# Altium PCB Control_Board.PcbDoc (part 3 of 4)
Units mm, origin at the board's own origin, x right, y up, seen from the top; angles counter-clockwise.
Board outline 90.17 x 96 mm, 6 copper layers (Top Layer, GND, POWER, Signal, PGND, Bottom Layer), stack 1.346 mm thick; 251 components, 196 nets, 963 pads, 633 vias.
Unrouted connection lines stored in the file: 3.
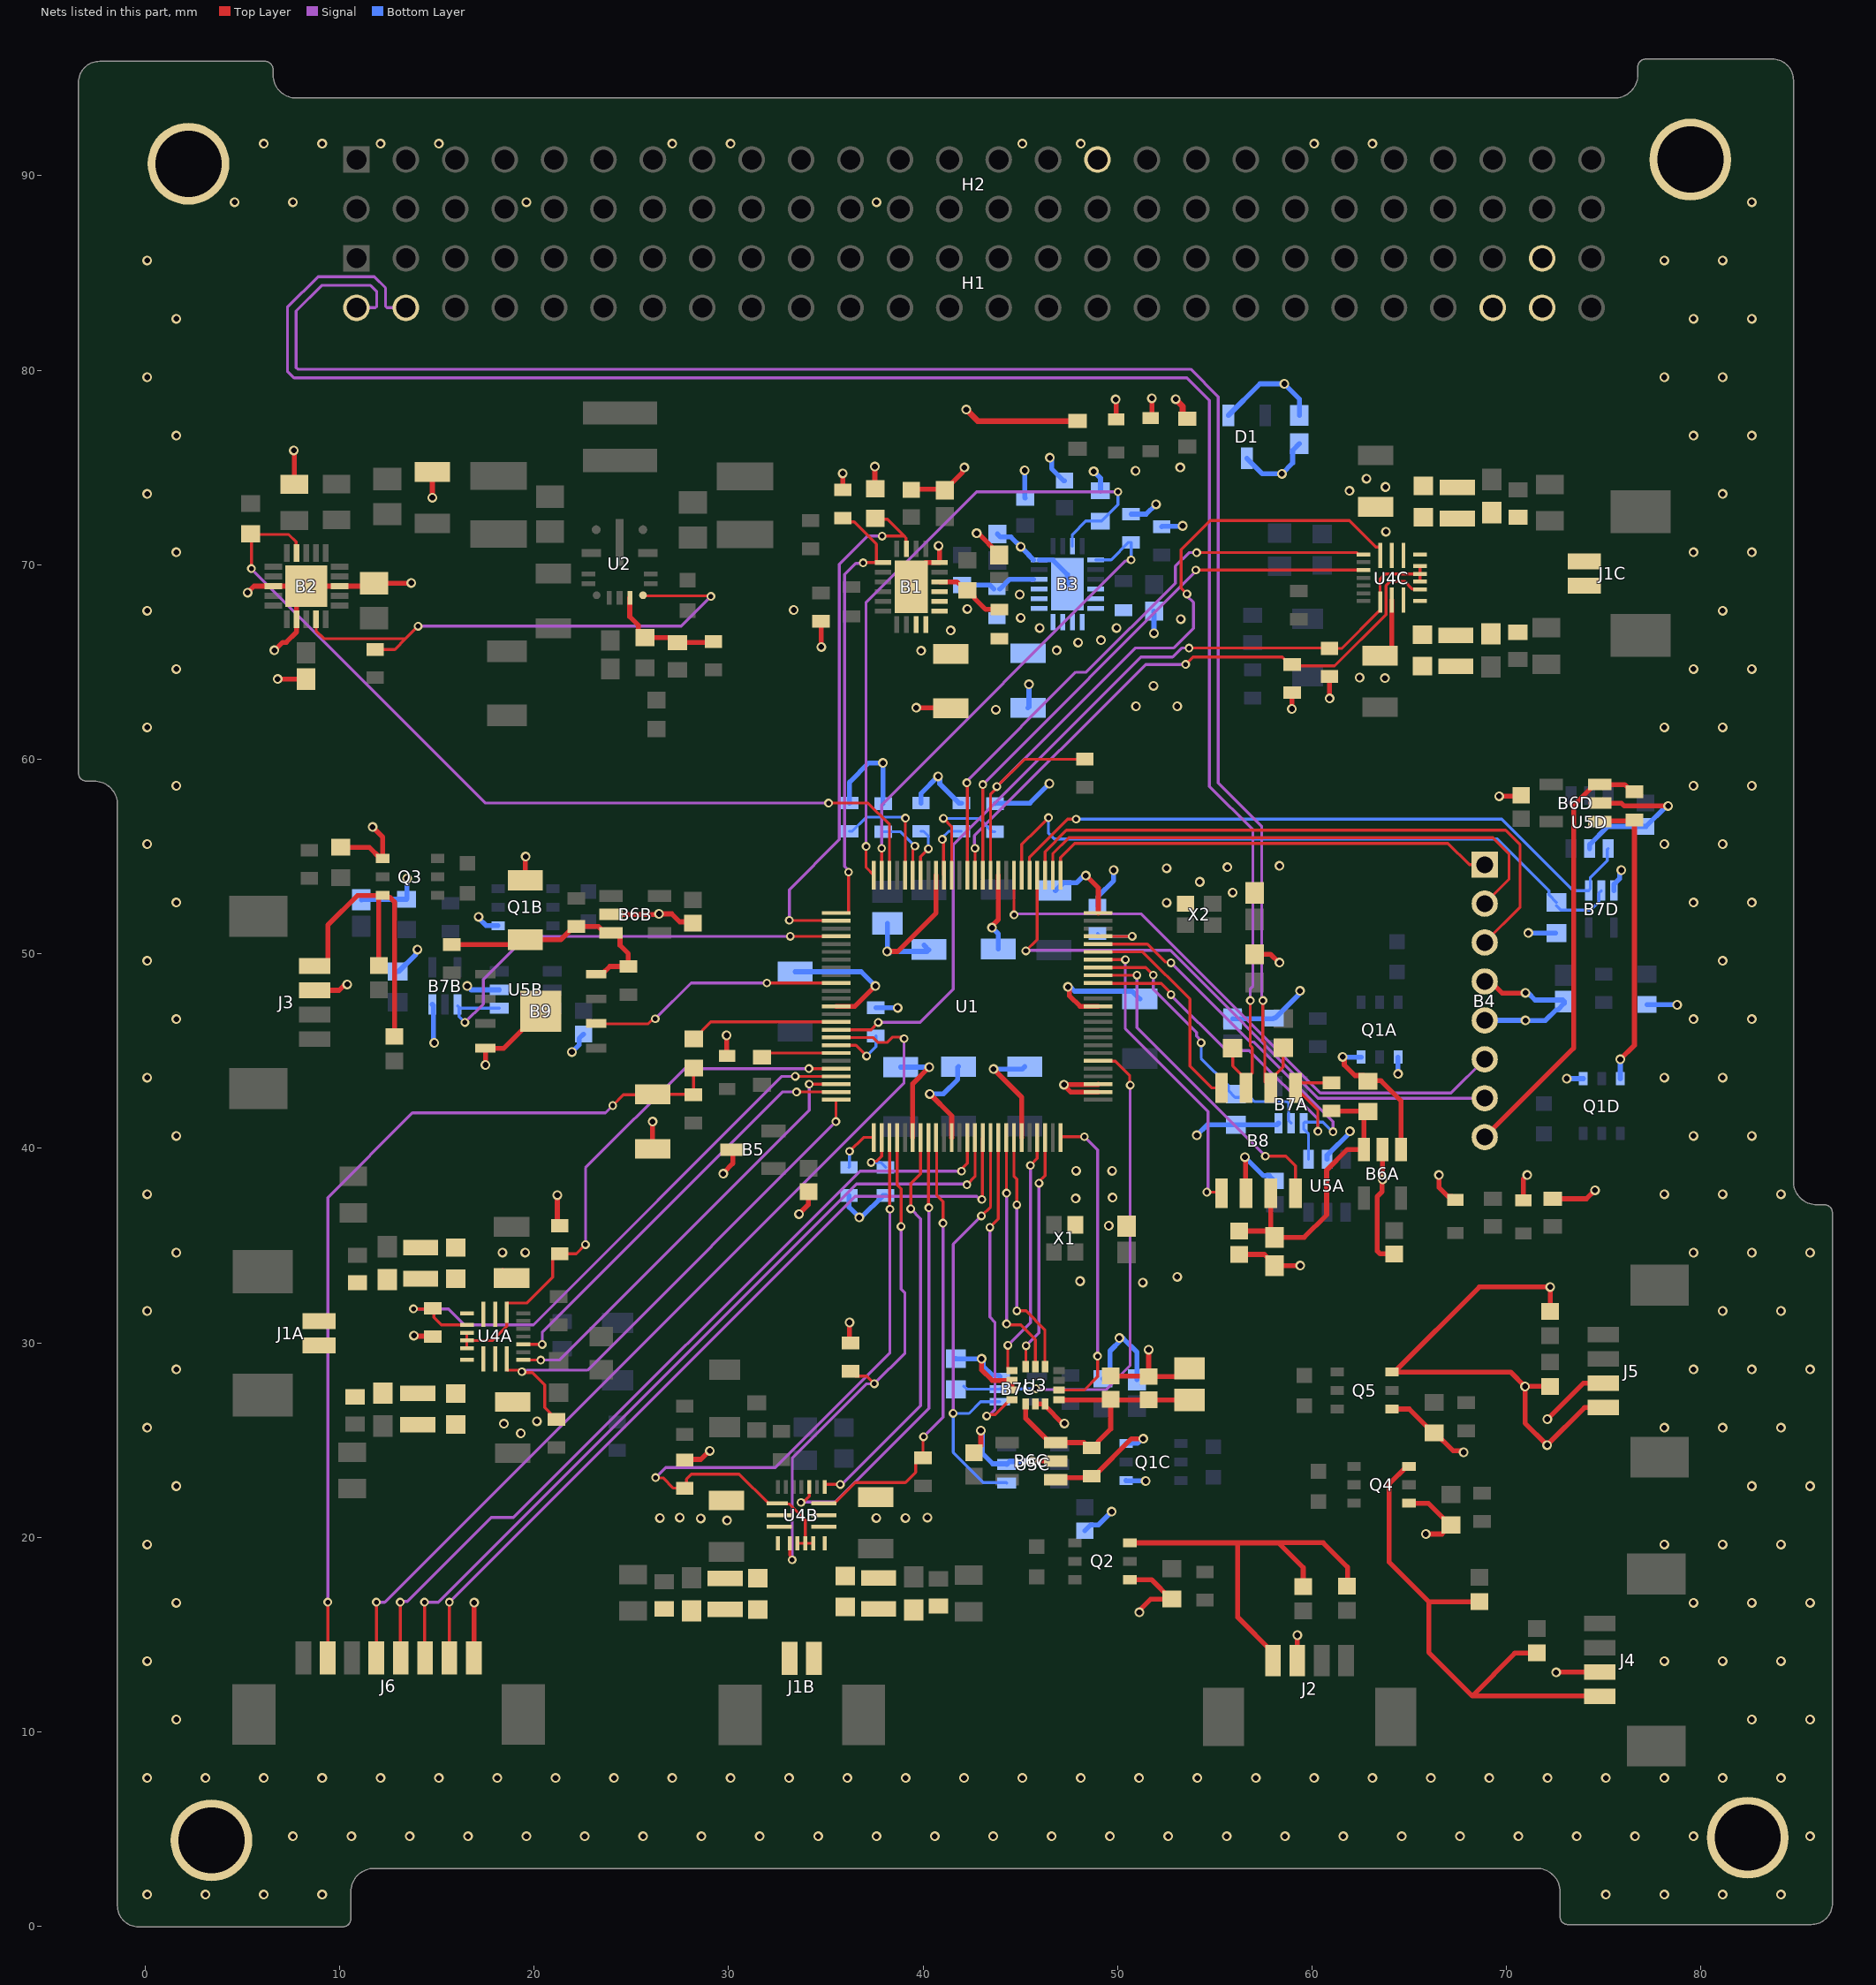
[diagram p6: the nets of this part, all layers, seen from the top]

## Via types
v1: diameter 0.5, hole 0.3, Top Layer to Bottom Layer, 487 vias
v2: diameter 0.45, hole 0.25, Top Layer to Bottom Layer, tented both sides, 146 vias

## Nets (pads, with @x,y where several pads share a name; then routed paths per layer and width w, separated by ;. In a path a pad name is that pad's centre, name@x,y a point inside that pad or via, vN(x,y) a via of type N, cw(c..) or ccw(c..) an arc to the next point about the centre after c; other vN are vias at no path point) (continued)
GND: (continued)
  Bottom Layer w0.254: C46B.1@11.125,52.778 11.152,52.805 R60B.1@13.45,52.805 13.475,52.83 v1(13.475,53.875) ; R58B.1@13,49.09 13.04,49.09 13.921,49.971 13.921,50.135 v1(14.007,50.22) ; B7B.3@14.775,47.4 14.825,47.35 14.825,45.475 v1(14.875,45.425) ; v1(16.571,48.35) 16.771,48.15 U5B.2@18.213,48.15 ; v1(17.15,51.9) 17.15,51.836 17.536,51.45 Q1B.1@18.156,51.45 ; v1(21.95,44.95) 22.318,45.318 22.318,45.643 C45B.2@22.55,45.875 ; C7.1@33.43,49.078 36.822,49.078 v1(37.55,48.35) ; R5.1@36.2,37.575 36.2,36.975 v1(36.725,36.45) 36.825,36.45 37.95,37.575 R6.1@38.075,37.575 ; R15.1@36.225,57.75 36.225,58.819 37.216,59.81 v1(37.94,59.81) 37.94,57.735 R14.1@37.95,57.725 ; R4.1@37.575,47.225 v1(38.7,47.225) ; v1(38.15,50.125) C8.1@40.203,50.125 ; C9.1@38.175,51.565 38.175,50.15 v1@38.285,50.04 ; C6.1@38.85,44.178 38.853,44.175 v1(40.325,44.175) ; R13.1@39.9,57.75 39.9,58.25 v1(40.775,59.125) 40.86,59.04 40.86,58.74 41.85,57.75 R12.1@41.975,57.75 ; C8.1@40.055,50.445 C8.1@40.3,50.2 ; v1(40.35,42.8) 41.05,42.8 41.788,43.538 41.788,44.165 C5.1@41.825,44.203 ; R58C.1@41.7,29.19 41.71,29.18 v1(43.01,29.18) 43.095,29.095 43.095,28.805 43.552,28.348 43.877,28.348 B7C.3@43.95,28.275 ; v1(42.975,25.5) 43.06,25.415 43.06,24.31 43.582,23.788 44.262,23.788 U5C.2@44.3,23.75 44.452,23.902 44.975,23.902 44.998,23.925 v1(45.625,23.925) ; v1(43.55,51.347) 43.55,51.344 43.875,51.019 C10.1@43.875,50.244 ; v1(43.625,44.075) 45.1,44.075 C4.1@45.225,44.2 ; R11.1@43.7,57.725 43.712,57.737 45.263,57.737 45.275,57.75 45.5,57.75 v1(46.5,58.75) ; R43.1@43.825,71.58 43.975,71.43 44.522,71.43 v1(45.027,70.925) 45.449,70.503 45.449,70.48 B3.16@45.677,70.252 ; v1(45.225,74.85) 45.225,73.449 R44.2@45.25,73.424 ; C27.2@45.4,62.65 45.45,62.7 v1(45.45,63.85) ; B3.16@45.975,70.25 45.977,70.248 46.677,70.248 47.425,69.5 B3.21@47.425,69 ; v1(46.525,75.5) 46.61,75.415 46.61,74.94 47.225,74.325 C29.2@47.275,74.325 ; C2.1@46.812,53.253 47.213,53.654 47.902,53.654 48.274,54.025 v1(48.375,54.025) ; v1(47.45,48.3) 47.571,48.3 47.792,48.079 50.749,48.079 C3.1@51.15,47.678 ; C45C.2@48.325,20.35 48.623,20.648 49.023,20.648 v1(49.7,21.325) ; v1(48.775,74.8) 49.125,74.45 R45.1@49.125,73.805 ; R9.1@48.975,52.5 49.002,52.527 49.002,52.962 49.8,53.76 v1(49.8,54.3) ; R60C.1@49.25,28.155 49.305,28.155 49.613,28.463 49.613,29.588 50.187,30.162 v1(50.1,30.25) ; v1@50.313,30.212 51,29.525 C46C.1@51,28.103 ; Q1C.1@50.44,22.925 50.453,22.912 51.438,22.912 v1(51.45,22.9) ; R42.1@50.7,72.6 51.473,72.6 v1(51.982,73.109) ; v1(51.875,66.475) R41.1@51.875,67.62 ; R46.1@52.275,71.95 52.3,71.975 53.325,71.975 v1(53.35,72) ; v1(54.075,40.675) 54.608,41.208 R58A.1@56.077,41.208 58.202,41.208 58.275,41.281 B7A.3@58.275,41.3 ; D1.1@55.7,77.675 57.325,79.3 v1(58.575,79.3) 59.35,78.525 C28.1@59.35,77.678 ; C46A.1@55.925,46.653 58.003,46.653 R60A.1@58.05,46.7 58.105,46.7 59.384,47.979 v1(59.384,48.098) ; v1(56.55,39.55) 57.506,38.594 57.806,38.594 C45A.2@58.075,38.325 ; U5A.2@60.775,39.437 60.775,39.645 61.95,40.82 v1(61.95,40.875) ; v1(64.425,43.825) Q1A.1@64.425,44.69 ; B4.5@68.88,46.58 70.97,46.58 v1(70.975,46.575) 72.003,46.575 72.539,47.111 72.627,47.111 72.975,47.459 C46D.1@72.975,47.547 72.895,47.627 71.469,47.627 71.096,48 v1(70.975,48) ; v1(71.125,51.075) 72.52,51.075 R58D.1@72.533,51.061 ; v1(73.097,43.585) Q1D.1@73.95,43.585 ; U5D.2@74.275,55.413 74.275,55.62 75.205,56.55 C45D.2@77.125,56.55 ; B7D.3@75.525,53.25 75.525,53.575 75.815,53.865 75.815,54.215 v1(75.9,54.3) ; C45D.2@77.15,56.55 C45D.2@77.125,56.55 ; R60D.1@77.225,47.395 78.755,47.395 v1(78.775,47.375) ; v1(78.31,57.6) 78.263,57.553 78.178,57.553 77.175,56.55 C45D.2@77.125,56.55
  other v1: 0.11,1.64 3.11,1.64 6.11,1.64 9.11,1.64 75.11,1.64 78.11,1.64 81.11,1.64 84.11,1.64 7.61,4.64 10.61,4.64 13.61,4.64 16.61,4.64 19.61,4.64 22.61,4.64 25.61,4.64 28.61,4.64 31.61,4.64 34.61,4.64 37.61,4.64 40.61,4.64 43.61,4.64 46.61,4.64 49.61,4.64 52.61,4.64 55.61,4.64 58.61,4.64 61.61,4.64 64.61,4.64 67.61,4.64 70.61,4.64 73.61,4.64 76.61,4.64 79.61,4.64 85.61,4.64 0.11,7.64 3.11,7.64 6.11,7.64 9.11,7.64 12.11,7.64 15.11,7.64 18.11,7.64 21.11,7.64 24.11,7.64 27.11,7.64 30.11,7.64 33.11,7.64 36.11,7.64 39.11,7.64 42.11,7.64 45.11,7.64 48.11,7.64 51.11,7.64 54.11,7.64 57.11,7.64 60.11,7.64 63.11,7.64 66.11,7.64 69.11,7.64 72.11,7.64 75.11,7.64 78.11,7.64 81.11,7.64 84.11,7.64 1.61,10.64 82.61,10.64 85.61,10.64 0.11,13.64 78.11,13.64 81.11,13.64 84.11,13.64 1.61,16.64 79.61,16.64 82.61,16.64 85.61,16.64 0.11,19.64 78.11,19.64 81.11,19.64 84.11,19.64 1.61,22.64 82.61,22.64 85.61,22.64 0.11,25.64 78.11,25.64 81.11,25.64 84.11,25.64 1.61,28.64 79.61,28.64 82.61,28.64 85.61,28.64 0.11,31.64 81.11,31.64 84.11,31.64 51.3,33.1 48.075,33.175 53.075,33.4 1.61,34.64 79.61,34.64 82.61,34.64 85.61,34.64 49.552,36.023 47.85,37.425 49.75,37.475 0.11,37.64 78.11,37.64 81.11,37.64 84.11,37.64 47.875,38.85 49.725,38.85 1.61,40.64 79.61,40.64 82.61,40.64 0.11,43.64 78.11,43.64 81.11,43.64 1.61,46.64 79.61,46.64 82.61,46.64 0.11,49.64 81.11,49.64 1.61,52.64 52.525,52.625 79.61,52.64 82.61,52.64 55.925,53.15 54.225,53.7 52.525,54.4 55.65,54.45 58.325,54.525 0.11,55.64 78.11,55.64 81.11,55.64 1.61,58.64 79.61,58.64 82.61,58.64 0.11,61.64 78.11,61.64 81.11,61.64 43.747,62.552 50.95,62.725 53.075,62.725 51.85,63.775 1.61,64.64 79.61,64.64 82.61,64.64 53.257,67.205 0.11,67.64 81.11,67.64 33.35,67.675 1.61,70.64 79.61,70.64 82.61,70.64 0.11,73.64 81.11,73.64 50.925,74.825 53.225,75 1.61,76.64 79.61,76.64 82.61,76.64 0.11,79.64 78.11,79.64 81.11,79.64 1.61,82.64 79.61,82.64 82.61,82.64 0.11,85.64 78.11,85.64 81.11,85.64 4.61,88.64 7.61,88.64 19.61,88.64 37.61,88.64 82.61,88.64 6.11,91.64 9.11,91.64 12.11,91.64 15.11,91.64 27.11,91.64 30.11,91.64 45.11,91.64 48.11,91.64 60.11,91.64 63.11,91.64
IDLE1: R4.2 U1.18 | length 3
  Top Layer w0.15: U1.18@35.537,45.3 36.55,45.3 v2(37.1,44.75)
  Bottom Layer w0.15: v2(37.1,44.75) 37.575,45.225 R4.2@37.575,45.775
IDLE2: R5.2 U1.26 | length 2.4
  Top Layer w0.15: v2(36.225,39.85) 36.937,40.562 U1.26@37.475,40.562
  Bottom Layer w0.15: R5.2@36.2,39.025 36.225,39.05 v2(36.225,39.85)
IDLE3: R6.2 U1.27 | length 2.5
  Top Layer w0.15: v2(37.33,39.28) 37.385,39.335 37.611,39.335 37.875,39.599 U1.27@37.875,40.562
  Bottom Layer w0.15: v2(37.33,39.28) 37.335,39.275 37.825,39.275 R6.2@38.075,39.025
IDLE6: R9.2 U1.72 | length 3.6
  Top Layer w0.15: U1.72@49.013,50.9 v2(50.76,50.9)
  Bottom Layer w0.15: R9.2@48.975,51.05 49.125,50.9 v2(50.76,50.9)
IDLE8: R11.2 U1.90 | length 6
  Top Layer w0.15: v2(41.05,56.96) 41.475,56.535 U1.90@41.475,54.038
  Bottom Layer w0.15: v2(41.05,56.96) 42.89,56.96 43.575,56.275 R11.2@43.7,56.275
IDLE9: R12.2 U1.91 | length 3.1
  Top Layer w0.15: v2(40.99,55.89) 41.05,55.83 41.05,54.063 U1.91@41.075,54.038
  Bottom Layer w0.15: v2(40.99,55.89) 40.99,55.96 41.33,56.3 R12.2@41.975,56.3
IDLE10: R13.2 U1.94 | length 2.7
  Top Layer w0.15: U1.94@39.875,54.038 39.875,55 v2(40.275,55.4)
  Bottom Layer w0.15: R13.2@39.9,56.3 40.025,56.3 40.275,56.05 v2(40.275,55.4)
IDLE11: R14.2 U1.95 | length 3.5
  Top Layer w0.15: U1.95@39.475,54.038 39.475,55.344 39.59,55.459 v2(39.59,55.54)
  Bottom Layer w0.15: R14.2@37.95,56.275 38.855,56.275 v2(39.59,55.54)
IDLE12: R15.2 U1.96 | length 6.1
  Top Layer w0.15: U1.96@39.075,54.038 39.087,54.051 39.087,56.962 v2(39.1,56.975)
  Bottom Layer w0.15: R15.2@36.225,56.3 36.35,56.3 37.076,57.026 39.049,57.026 v2(39.1,56.975)
IMON-3V3: B1.19 R26.2 U1.2 | length 28.3
  Top Layer w0.15: v2(33.125,51.725) 33.138,51.712 35.524,51.712 U1.2@35.537,51.7 ; R26.2@37.55,72.39 37.605,72.335 38.172,72.335 39.032,71.475 ; v2(37.9,71.475) 39.032,71.475 ; B1.19@39.15,70.825 39.132,70.843 39.132,71.375 39.032,71.475
  Signal w0.15: v2(33.125,51.725) 33.125,53.296 35.7,55.871 35.7,70.025 37.15,71.475 v2(37.9,71.475)
IMON-5V: B3.19 R45.2 U1.100 | length 33.8
  Top Layer w0.15: v2(37.075,55.525) 37.075,54.438 U1.100@37.475,54.038
  Signal w0.15: v2(37.075,55.525) 37.075,68.075 42.75,73.75 v2(50.025,73.75)
  Bottom Layer w0.15: B3.19@47.675,70.95 47.675,71.55 48.37,72.245 R45.2@49.125,72.245 49.18,72.245 50.025,73.09 v2(50.025,73.75)
IMU-CLK: U1.43 U3.13 | length 12.8
  Top Layer w0.15: U1.43@44.275,40.562 44.287,40.549 44.287,37.713 v2(44.3,37.7) ; v2(44.3,30.975) 44.35,30.925 45.025,30.925 45.78,30.17 U3.13@45.78,28.78
  Signal w0.15: v2(44.3,30.975) v2(44.3,37.7)
IMU-COMP: B7C.1 U1.41 U5C.1 | length 23
  Top Layer w0.15: v2(43,36.525) 43.475,37 U1.41@43.475,40.562
  Signal w0.15: v2(41.55,26.375) 41.55,35.075 v2(43,36.525)
  Bottom Layer w0.15: B7C.1@43.95,26.975 42.965,26.975 42.365,26.375 v2(41.55,26.375) 41.55,24.375 43.1,22.825 44.275,22.825 U5C.1@44.3,22.8
IMU-CS: U1.44 U3.12 | length 12.7
  Top Layer w0.15: U1.44@44.675,40.562 44.675,38.575 44.825,38.425 v2(44.825,37.1) ; v2(44.825,31.65) 45.3,31.65 46.265,30.685 46.265,28.795 U3.12@46.28,28.78
  Signal w0.15: v2(44.825,31.65) v2(44.825,37.1)
IMU-EN: B7C.2 R58C.2 U1.56 | length 26
  Top Layer w0.15: U1.56@49.013,44.5 49.03,44.483 49.892,44.483 50.625,43.75 50.625,43.275 v2(50.65,43.25)
  Signal w0.15: v2(45.8,27.65) 45.85,27.6 49.4,27.6 50.65,28.85 v2(50.65,43.25)
  Bottom Layer w0.15: R58C.2@42.1,27.774 42.249,27.625 B7C.2@43.95,27.625 43.963,27.637 45.787,27.637 v2(45.8,27.65)
IMU-INT1: U1.42 U3.4 | length 16.5
  Top Layer w0.15: v2(43.27,26.246) 43.347,26.323 43.706,26.323 44.457,27.074 U3.4@44.57,27.074 ; v2(43.44,35.94) 43.875,36.375 U1.42@43.875,40.562
  Signal w0.15: v2(43.27,26.246) 43.378,26.246 43.7,26.568 43.7,31.07 43.44,31.33 v2(43.44,35.94)
IMU-INT2: U1.50 U3.9 | length 16.1
  Top Layer w0.15: U3.9@46.99,27.574 48.287,27.575 48.975,28.262 v2(48.975,29.325) ; U1.50@47.075,40.562 47.075,40.575 47.1,40.6 v2(48.3,40.6)
  Signal w0.15: v2(48.3,40.6) 48.975,39.925 v2(48.975,29.325)
IMU-MISO: U1.47 U3.1 | length 12.7
  Top Layer w0.15: v2(44.36,29.88) 44.36,28.675 44.461,28.574 U3.1@44.57,28.574 ; v2(45.525,39.125) 45.525,39.132 45.875,39.482 U1.47@45.875,40.542
  Signal w0.15: v2(44.36,29.88) 45.525,31.045 v2(45.525,39.125)
IMU-MOSI: U1.48 U3.14 | length 12.2
  Top Layer w0.15: U3.14@45.28,28.78 45.29,28.79 45.29,29.84 v2(45.3,29.85) ; v2(45.962,38.212) 45.962,38.295 46.275,38.607 U1.48@46.275,40.562
  Signal w0.15: v2(45.3,29.85) 45.962,30.512 v2(45.962,38.212)
IMU_VSEN: B6C.1 Q1C.3 R47.2 | length 6.4
  Top Layer w0.254: B6C.1@46.825,22.975 46.912,23.062 48.587,23.062 R47.2@48.675,23.15 48.8,23.15 50.723,25.073 v1(51.323,25.073)
  Bottom Layer w0.254: Q1C.3@50.44,24.825 50.453,24.838 51.026,24.838 51.261,25.073 v1(51.323,25.073)
ISEN_IFBFIL1: R55A.2 U1.21 U4A.1 U4A.6 U4A.7 U4A.8 | length 28.9
  Top Layer w0.15: U4A.8@16.55,29.725 U4A.7@16.55,30.125 ; U4A.6@16.55,30.525 U4A.7@16.55,30.125 ; U4A.1@18.6,31.345 18.6,30.85 17.875,30.125 U4A.7@16.55,30.125 ; U4A.1@18.6,31.577 18.6,32.021 18.627,32.048 19.628,32.048 20.955,33.375 20.955,33.679 20.956,34.321 21.211,34.576 22.176,34.576 v2(22.65,35.05) ; v2(34.14,44.1) U1.21@35.537,44.1
  Signal w0.15: v2(22.65,35.05) 22.65,39 27.75,44.1 v2(34.14,44.1)
ISEN_IFBFIL2: R55B.2 U1.28 U4B.1 U4B.6 U4B.7 U4B.8 | length 37.2
  Top Layer w0.15: v2(26.25,23.075) 26.264,23.061 26.643,23.061 27.168,22.536 R55B.2@27.74,22.536 ; R55B.2@27.75,22.526 27.836,22.612 27.836,22.993 28.093,23.25 30.554,23.25 32.054,21.75 U4B.1@32.498,21.75 32.525,21.723 33.12,21.723 33.95,20.894 U4B.7@33.95,19.7 ; U4B.6@33.55,19.7 U4B.7@33.95,19.7 ; U4B.8@34.35,19.7 U4B.7@33.95,19.7 ; U1.28@38.275,40.562 38.288,40.549 38.288,36.888 v2(38.3,36.875)
  Signal w0.15: v2(26.25,23.075) 26.775,23.6 32.4,23.6 38.3,29.5 v2(38.3,36.875)
ISEN_IFBFIL3: R55C.2 U1.16 U4C.1 U4C.6 U4C.7 U4C.8 | length 45.9
  Top Layer w0.15: U1.16@35.537,46.1 37.325,46.1 v2(37.7,46.475) ; v2(53.68,65.721) 60.853,65.721 60.875,65.7 61.536,65.7 63.444,67.607 63.476,67.607 63.503,67.634 U4C.1@63.503,68.079 63.503,69.279 63.755,69.531 U4C.7@65.553,69.531 ; U4C.6@65.553,69.131 U4C.7@65.553,69.531 ; U4C.8@65.553,69.931 U4C.7@65.553,69.531
  Signal w0.15: v2(37.7,46.475) 39.85,46.475 41.55,48.175 41.55,55.6 51.2,65.25 52.829,65.25 53.3,65.721 v2(53.68,65.721)
JTAG-TCK: J6.5 U1.38 | length 42.8
  Top Layer w0.15: v2(13.125,16.675) 13.125,13.829 J6.5@13.15,13.805 ; v2(41.98,38.83) 41.98,38.938 42.275,39.233 U1.38@42.275,40.562
  Signal w0.15: v2(13.125,16.675) 13.166,16.716 13.491,16.716 17.8,21.025 18.95,21.025 36.755,38.83 v2(41.98,38.83)
JTAG-TDI: J6.6 U1.39 | length 42.3
  Top Layer w0.15: v2(14.375,16.675) 14.375,13.829 J6.6@14.4,13.805 ; v2(42.26,38.13) 42.675,38.545 U1.39@42.675,40.562
  Signal w0.15: v2(14.375,16.675) 15.075,16.675 36.575,38.175 42.215,38.175 v2(42.26,38.13)
JTAG-TDO: J6.7 U1.40 | length 42.2
  Top Layer w0.15: J6.7@15.65,13.805 v2(15.65,16.675) ; v2(43.025,37.375) 43.05,37.4 43.05,40.537 U1.40@43.075,40.562
  Signal w0.15: v2(15.65,16.675) 36.515,37.54 42.752,37.54 42.917,37.375 v2(43.025,37.375)
JTAG-TMS: J6.4 U1.17 | length 47.1
  Top Layer w0.15: J6.4@11.9,13.805 v2(11.9,16.675) ; U1.17@35.537,45.7 37.417,45.7 37.667,45.45 38.179,45.45 38.45,45.721 38.6,45.721 38.604,45.717 38.948,45.717 v2(39.025,45.64)
  Signal w0.15: v2(11.9,16.675) 12.325,16.675 39.025,43.375 v2(39.025,45.64)
LDO-3V3: B2.4 R29.1 U1.98 | length 45.8
  Top Layer w0.15: v2(5.475,69.8) 5.475,71.513 5.431,71.557 7.393,71.557 7.766,71.184 7.766,70.634 B2.4@7.8,70.6 ; v2(35.15,57.75) 37.171,57.75 38.275,56.646 U1.98@38.275,54.038
  Signal w0.15: v2@5.408,69.842 17.5,57.75 v2(35.15,57.75)
LDO_EN-3V3: B2.14 R34.1 U2.5 | length 27.3
  Top Layer w0.15: B2.14@8.8,67.2 8.8,66.6 9.2,66.2 13.4,66.2 ; R34.1@11.831,65.648 12.848,65.648 13.4,66.2 ; v2(14.04,66.84) 13.4,66.2 ; U2.5@25.606,68.431 25.634,68.403 29.072,68.403 v2(29.1,68.375)
  Signal w0.15: v2(14.04,66.84) 27.565,66.84 v2(29.1,68.375)
LNFIL1: C33A.2 L2A.1 U4A.3
LNFIL2: C33B.2 L2B.1 U4B.3
LNFIL3: C33C.2 L2C.1 U4C.3
LPFIL1: C34A.2 L3A.1 U4A.10
LPFIL2: C34B.2 L3B.1 U4B.10
LPFIL3: C34C.2 L3C.1 U4C.10
MCLR: R2.2 U1.15 | length 7.7
  Top Layer w0.15: R2.2@28.175,45.622 28.216,45.622 29.094,46.5 U1.15@35.537,46.5
MCLR-P: C1.1 J6.2 R1.1 R2.1 | length 46.1
  Top Layer w0.15: J6.2@9.4,13.805 v2(9.4,16.675) ; v2(24.05,42.2) 24.6,42.75 26.075,42.75 C1.1@26.1,42.775 28.175,42.775 R1.1@28.2,42.75 28.2,44.113 R2.1@28.216,44.128
  Signal w0.15: v2(9.4,16.675) 9.4,37.475 13.75,41.825 23.675,41.825 v2(24.05,42.2)
MGN-CLK: B4.1 U1.76 | length 23.5
  Top Layer w0.15: U1.76@47.075,54.038 47.075,54.95 47.8,55.675 66.993,55.675 68.089,54.579 B4.1@68.88,54.58 B4.1@68.88,54.58
MGN-COMP: B7D.1 U1.80 U5D.1 | length 34.6
  Top Layer w0.15: U1.80@45.475,54.038 45.475,54.975 47.425,56.925 v2(47.875,56.925)
  Bottom Layer w0.15: v2(47.875,56.925) 69.75,56.925 73.425,53.25 B7D.1@74.225,53.25 74.306,53.331 74.306,53.912 75.183,54.789 75.183,55.371 U5D.1@75.225,55.413
MGN-CS: B4.7 U1.79 | length 30.9
  Top Layer w0.15: v2(45.29,50.15) 45.875,50.735 U1.79@45.875,54.038
  Signal w0.15: v2(45.29,50.15) 45.315,50.175 52.715,50.175 60.31,42.58 B4.7@68.88,42.58
MGN-EN: B7D.2 R58D.2 U1.81 | length 35.1
  Top Layer w0.15: U1.81@45.075,54.038 45.075,55.625 45.883,56.433 v2(46.45,57)
  Bottom Layer w0.15: v2(46.45,57) 46.45,56.2 46.75,55.9 69.53,55.9 72.182,53.248 72.182,53.033 R58D.2@72.573,52.641 ; R58D.2@72.573,52.477 72.8,52.25 74.325,52.25 74.75,52.675 74.75,53.125 B7D.2@74.875,53.25
MGN-MISO: B4.2 U1.77 | length 28.3
  Top Layer w0.15: U1.77@46.675,54.038 46.675,55.15 47.5,55.975 69.3,55.975 70.125,55.15 70.125,53.825 B4.2@68.88,52.58
MGN-MOSI: B4.3 U1.78 | length 32.2
  Top Layer w0.15: U1.78@46.275,54.038 46.275,55.25 47.375,56.35 69.95,56.35 70.7,55.6 70.7,52.4 B4.3@68.88,50.58
MGN_DRDY: B4.6 U1.82 | length 30.8
  Top Layer w0.15: v2(44.68,52) U1.82@44.68,54.033
  Signal w0.15: v2(44.68,52) 44.73,52.05 51.23,52.05 60.43,42.85 67.15,42.85 B4.6@68.88,44.58
MGN_VSEN: B6D.1 Q1D.3 R48.2 | length 15.4
  Top Layer w0.254: B6D.1@74.8,56.8 74.837,56.837 76.537,56.837 R48.2@76.575,56.875 76.575,45.3 v1(75.85,44.575)
  Bottom Layer w0.254: Q1D.3@75.85,43.585 v1(75.85,44.575)
MGTQ1-EN: R49A.1 U1.22 U4A.5 | length 30.7
  Top Layer w0.15: v2(13.8,31.75) 14.775,31.75 R49A.1@14.8,31.775 14.857,31.718 14.857,31.313 15.245,30.925 16.515,30.925 U4A.5@16.55,30.925 ; v2(33.43,43.7) U1.22@35.537,43.7
  Signal w0.15: v2(13.8,31.75) 15.6,31.75 16.425,30.925 19.974,30.925 32.749,43.7 v2(33.43,43.7)
MGTQ1-FT: U1.23 U4A.13 | length 22.7
  Top Layer w0.15: U4A.13@19.45,29.125 19.452,29.122 20.348,29.122 v2(20.35,29.12) ; v2(34.15,43.3) U1.23@35.537,43.3
  Signal w0.15: v2(20.35,29.12) 21.307,29.12 34.15,41.963 v2(34.15,43.3)
MGTQ1-MODE: R53A.2 U1.25 U4A.12 | length 27.5
  Top Layer w0.15: U4A.12@18.6,29.175 18.6,28.629 18.627,28.602 19.191,28.602 19.271,28.522 v2(19.379,28.522) 19.426,28.475 19.925,28.475 20.55,27.85 20.55,26.675 R53A.2@21.15,26.075 ; v2(35.525,41.375) 35.525,42.488 U1.25@35.537,42.5
  Signal w0.15: v2(19.379,28.522) 19.456,28.598 19.475,28.579 19.598,28.579 19.617,28.598 22.748,28.598 v2(35.525,41.375)
MGTQ1-PWM: U1.24 U4A.15 | length 21.8
  Top Layer w0.15: U4A.15@19.45,29.925 v2(20.425,29.925) ; v2(33.5,42.9) U1.24@35.537,42.9
  Signal w0.15: v2(20.425,29.925) 20.425,30.55 32.775,42.9 v2(33.5,42.9)
MGTQ2-EN: R49B.1 U1.29 U4B.5 | length 26.9
  Top Layer w0.15: U4B.5@33.15,19.7 33.15,19.083 33.275,18.958 v2(33.275,18.85) ; R49B.1@36.275,28.55 36.525,28.3 37.1,28.3 v2(37.5,27.9) ; U1.29@38.675,40.562 38.675,38.115 38.87,37.92 v2(38.87,35.98)
  Signal w0.15: v2(33.275,18.85) 33.275,24.075 37.1,27.9 v2(37.5,27.9) 39.07,29.47 39.07,32.571 38.87,32.771 v2(38.87,35.98)
MGTQ2-FT: U1.32 U4B.13 | length 20.9
  Top Layer w0.15: U4B.13@34.95,22.6 34.95,22.698 34.977,22.725 v2(35.75,22.725) ; v2(39.37,36.89) 39.37,38.19 39.875,38.695 U1.32@39.875,40.562
  Signal w0.15: v2(35.75,22.725) 35.825,22.725 39.875,26.775 39.875,36.385 v2(39.37,36.89)
MGTQ2-MODE: R53B.2 U1.34 U4B.12 | length 23.7
  Top Layer w0.15: U4B.12@34.9,21.75 35.446,21.75 35.473,21.777 35.473,21.788 36.51,22.825 39.096,22.825 39.625,23.354 39.625,23.85 39.875,24.1 R53B.2@40,24.1 40,25.3 40.025,25.275 v2(40.025,25.175) ; U1.34@40.675,40.562 40.7,40.537 40.7,37.6 41.03,37.27 v2(41.03,36.16)
  Signal w0.15: v2(40.025,25.175) 41.03,26.18 v2(41.03,36.16)
MGTQ2-PWM: U1.33 U4B.15 | length 23.6
  Top Layer w0.15: v2(33.725,21.8) 33.833,21.8 34.055,22.021 34.065,22.021 34.15,22.106 U4B.15@34.15,22.6 ; U1.33@40.275,40.562 40.287,40.549 40.287,36.963 v2(40.3,36.95)
  Signal w0.15: v2(33.725,21.8) 33.75,21.825 35.5,21.825 40.3,26.625 v2(40.3,36.95)
MGTQ3-EN: R49C.1 U1.87 U4C.5 | length 31.8
  Top Layer w0.15: U1.87@42.675,54.038 v2(42.675,55.425) ; v2(53.5,64.875) 53.875,65.25 58.476,65.25 58.85,64.876 R49C.1@58.975,64.876 ; R49C.1@58.975,64.801 61.161,64.801 63.8,67.44 63.8,68.926 64.027,69.153 64.757,69.153 65.153,68.757 65.526,68.757 U4C.5@65.553,68.731
  Signal w0.15: v2(42.675,55.425) 42.65,55.45 42.65,56.075 51.45,64.875 v2(53.5,64.875)
MGTQ3-FT: U1.88 U4C.13 | length 30.7
  Top Layer w0.15: v2(42.25,58.79) 42.275,58.765 U1.88@42.275,54.038 ; v2(54.075,70.625) 62.304,70.625 62.399,70.531 U4C.13@62.653,70.531
  Signal w0.15: v2(42.25,58.79) 42.25,58.87 47.855,64.475 48.4,64.475 52.975,69.05 52.975,69.925 53.675,70.625 v2(54.075,70.625)
MGTQ3-MODE: R53C.2 U1.85 U4C.12 | length 39.5
  Top Layer w0.15: U1.85@43.475,54.038 43.475,58.218 43.8,58.543 v2(43.8,58.6) 45.2,60 R53C.2@48.4,60 ; v2(53.569,68.499) 53.275,68.793 53.275,70.775 54.776,72.276 61.92,72.276 63.285,70.91 63.476,70.91 63.503,70.884 U4C.12@63.503,70.481
  Signal w0.15: v2(43.8,58.6) 50.925,65.725 52.9,65.725 53.904,66.729 53.904,68.063 53.569,68.398 v2(53.569,68.499)
MGTQ3-PWM: U1.86 U4C.15 | length 28.8
  Top Layer w0.15: U1.86@43.075,54.038 v2(43.075,58.699) ; v2(54.03,69.729) U4C.15@62.651,69.729
  Signal w0.15: v2(43.075,58.699) 54.03,69.654 v2(54.03,69.729)
MGTQ-NFIL1: C37A.1 C42A.1 J1A.1 L2A.2
MGTQ-NFIL2: C37B.1 C42B.1 J1B.1 L2B.2
MGTQ-NFIL3: C37C.1 C42C.1 J1C.1 L2C.2
MGTQ-PFIL1: C38A.1 C43A.1 J1A.2 L3A.2
MGTQ-PFIL2: C38B.1 C43B.1 J1B.2 L3B.2
MGTQ-PFIL3: C38C.1 C43C.1 J1C.2 L3C.2
MRAM-CLK: B9.6 U1.10 | length 13.2
  Top Layer w0.15: B9.6@23.2,46.415 23.215,46.4 25.872,46.4 26.132,46.66 v2(26.24,46.66) ; v2(31.975,48.5) U1.10@35.537,48.5
  Signal w0.15: v2(26.24,46.66) 28.08,48.5 v2(31.975,48.5)
MRAM-COMP: B7B.1 U1.4 U5B.1 | length 24.9
  Top Layer w0.15: v2(33.175,50.9) U1.4@35.537,50.9
  Signal w0.15: v2(16.45,46.47) 17.399,47.419 17.399,48.679 19.62,50.9 v2(33.175,50.9)
  Bottom Layer w0.15: v2(16.45,46.47) 16.147,46.773 16.147,47.253 16.075,47.325 16.2,47.2 U5B.1@18.213,47.2

## Text inside footprints (layer, text, board x,y; h text height)
LED1: Mechanical 13 "RefDes2" at 29.285,46.133 h1.27 r270
LED2: Mechanical 13 "RefDes2" at 66.74,38.723 h1.27 r270
LED3: Mechanical 13 "RefDes2" at 49.295,78.842 h1.27 r270
LED4: Mechanical 13 "RefDes2" at 70.24,38.697 h1.27 r270
LED5: Mechanical 13 "RefDes2" at 51.065,78.902 h1.27 r270
U3: Top Overlay "*" at 42.85,28.16 h1.27; Mechanical 13 "*" at 44.49,28.189 h1.27
U5A: Mechanical 13 "*" at 60.597,38.888 h1.27 r90; Board Layer Stack Bottom Overlay "*" at 58.665,39.93 h1.27 r90
U5B: Mechanical 13 "*" at 18.762,47.972 h1.27 r180; Board Layer Stack Bottom Overlay "*" at 17.72,46.04 h1.27 r180
U5C: Mechanical 13 "*" at 44.85,23.572 h1.27 r180; Board Layer Stack Bottom Overlay "*" at 43.808,21.64 h1.27 r180
U5D: Mechanical 13 "*" at 74.453,55.962 h1.27 r270; Board Layer Stack Bottom Overlay "*" at 76.385,54.92 h1.27 r270